# Altium PCB DPM20140124.PcbDoc (part 1 of 3)
Units mil, origin at the board's own origin, x right, y up, seen from the top; angles counter-clockwise.
Board outline 4950 x 7375 mil, 2 copper layers (Top Layer, Bottom Layer); 198 components, 330 nets, 1077 pads, 152 vias.
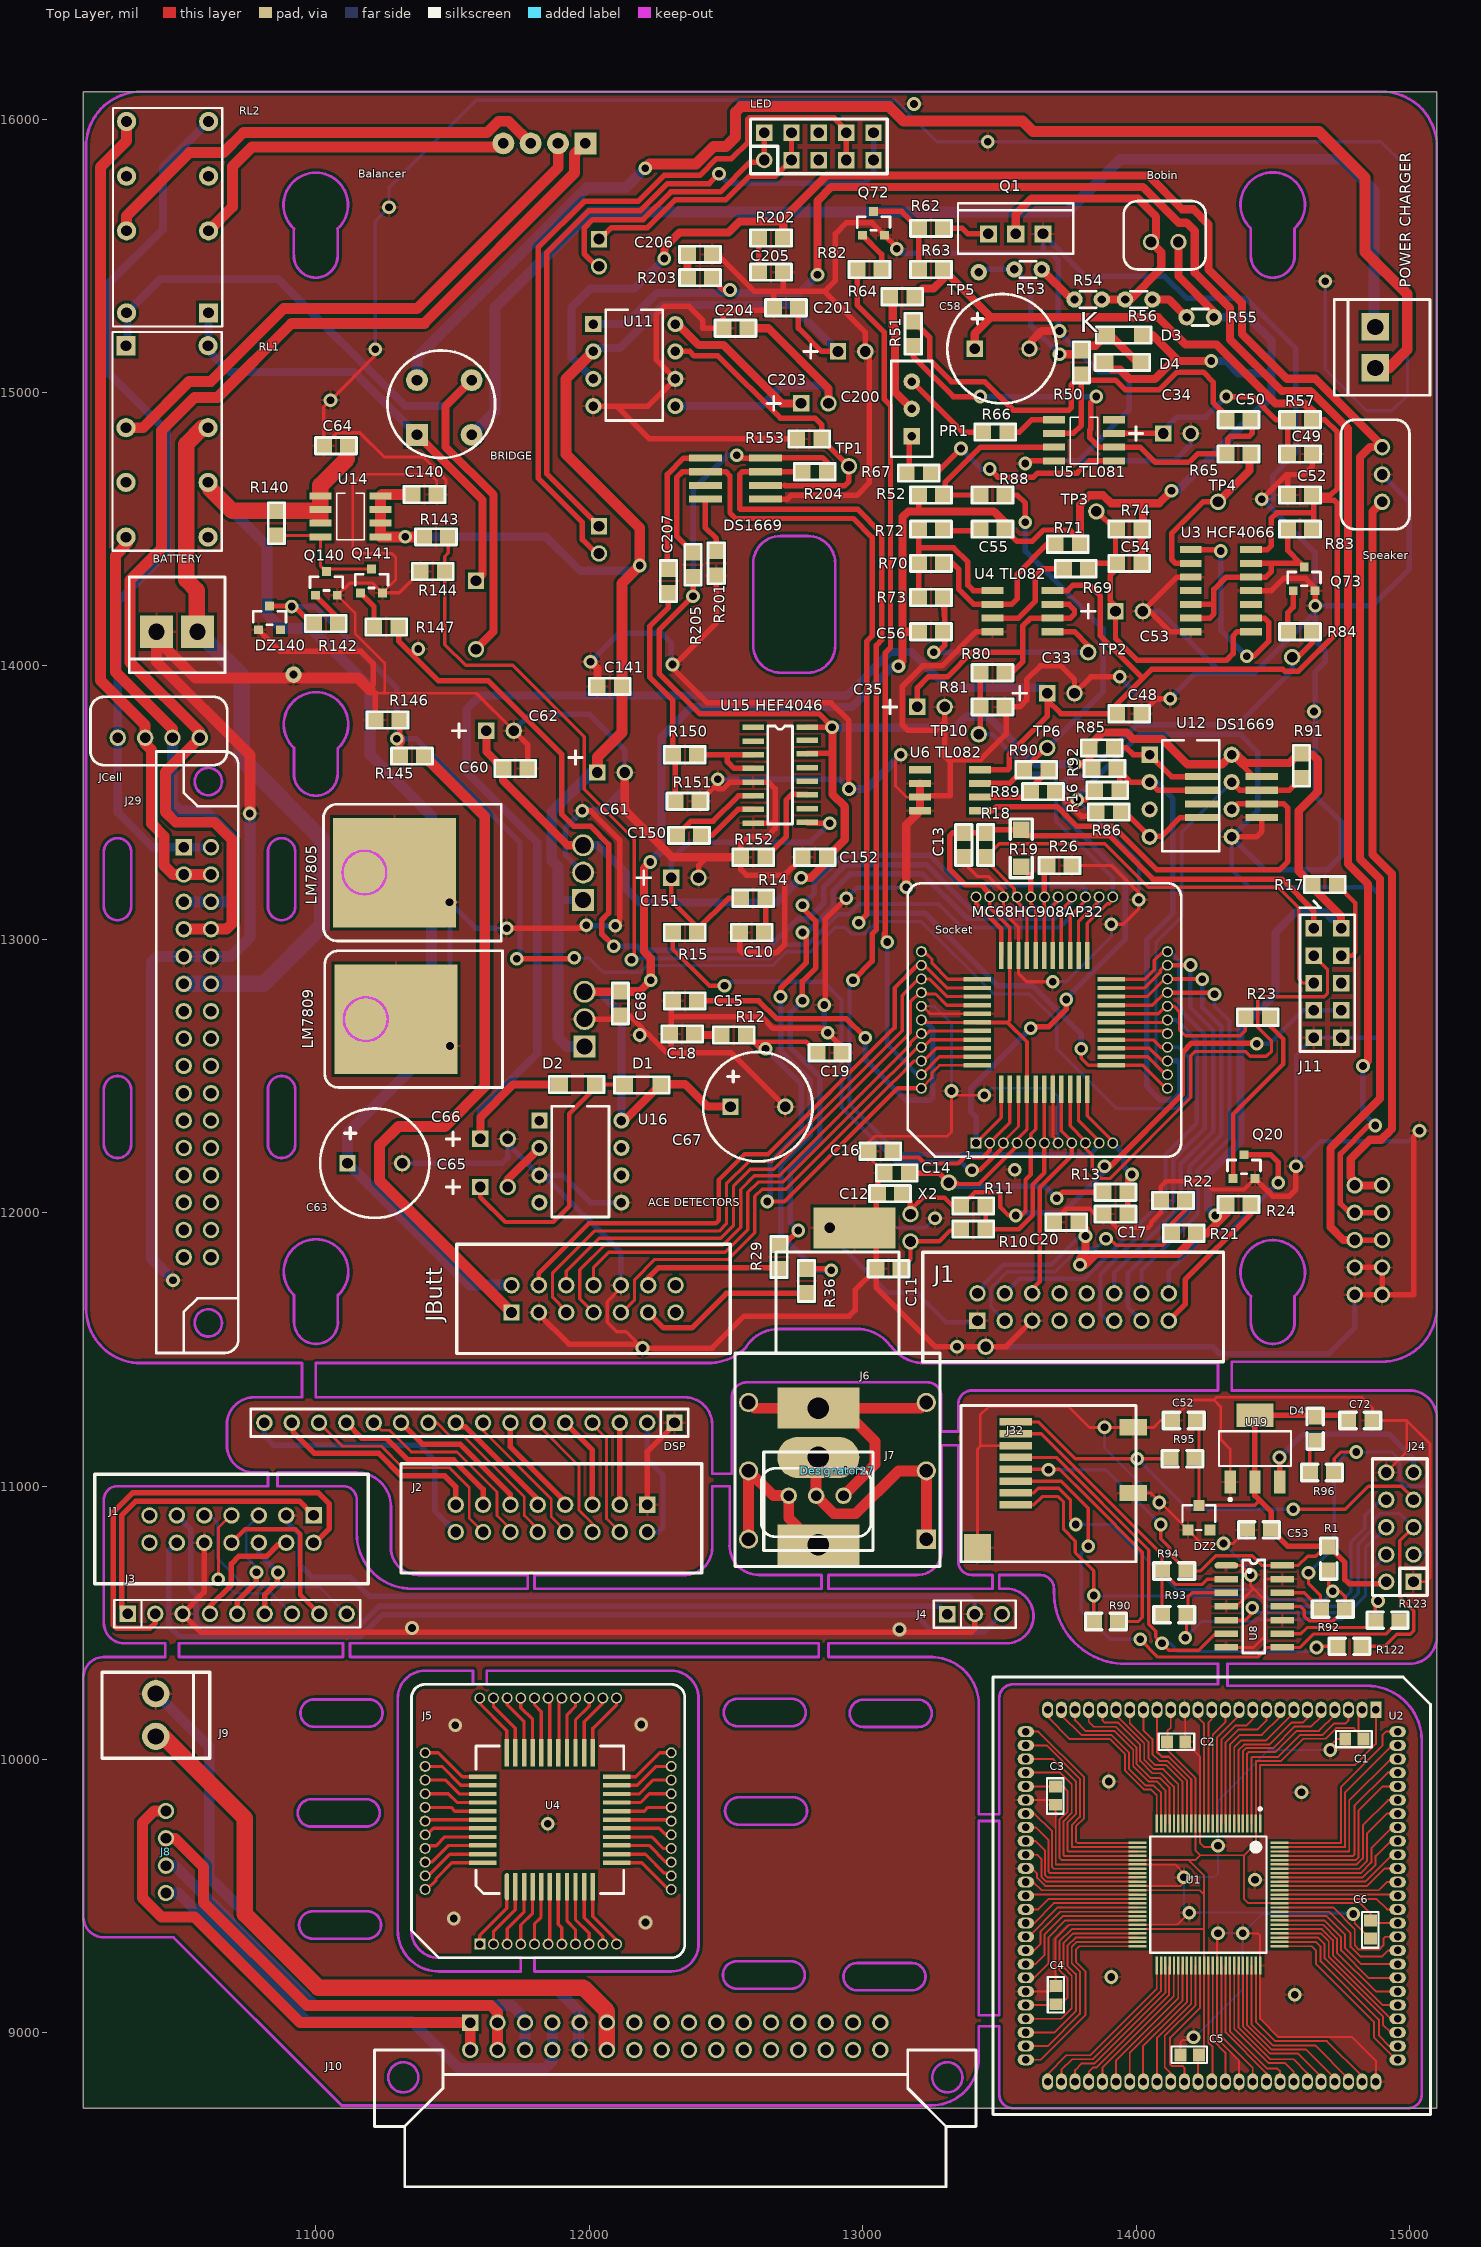
[diagram p0: Top Layer view]
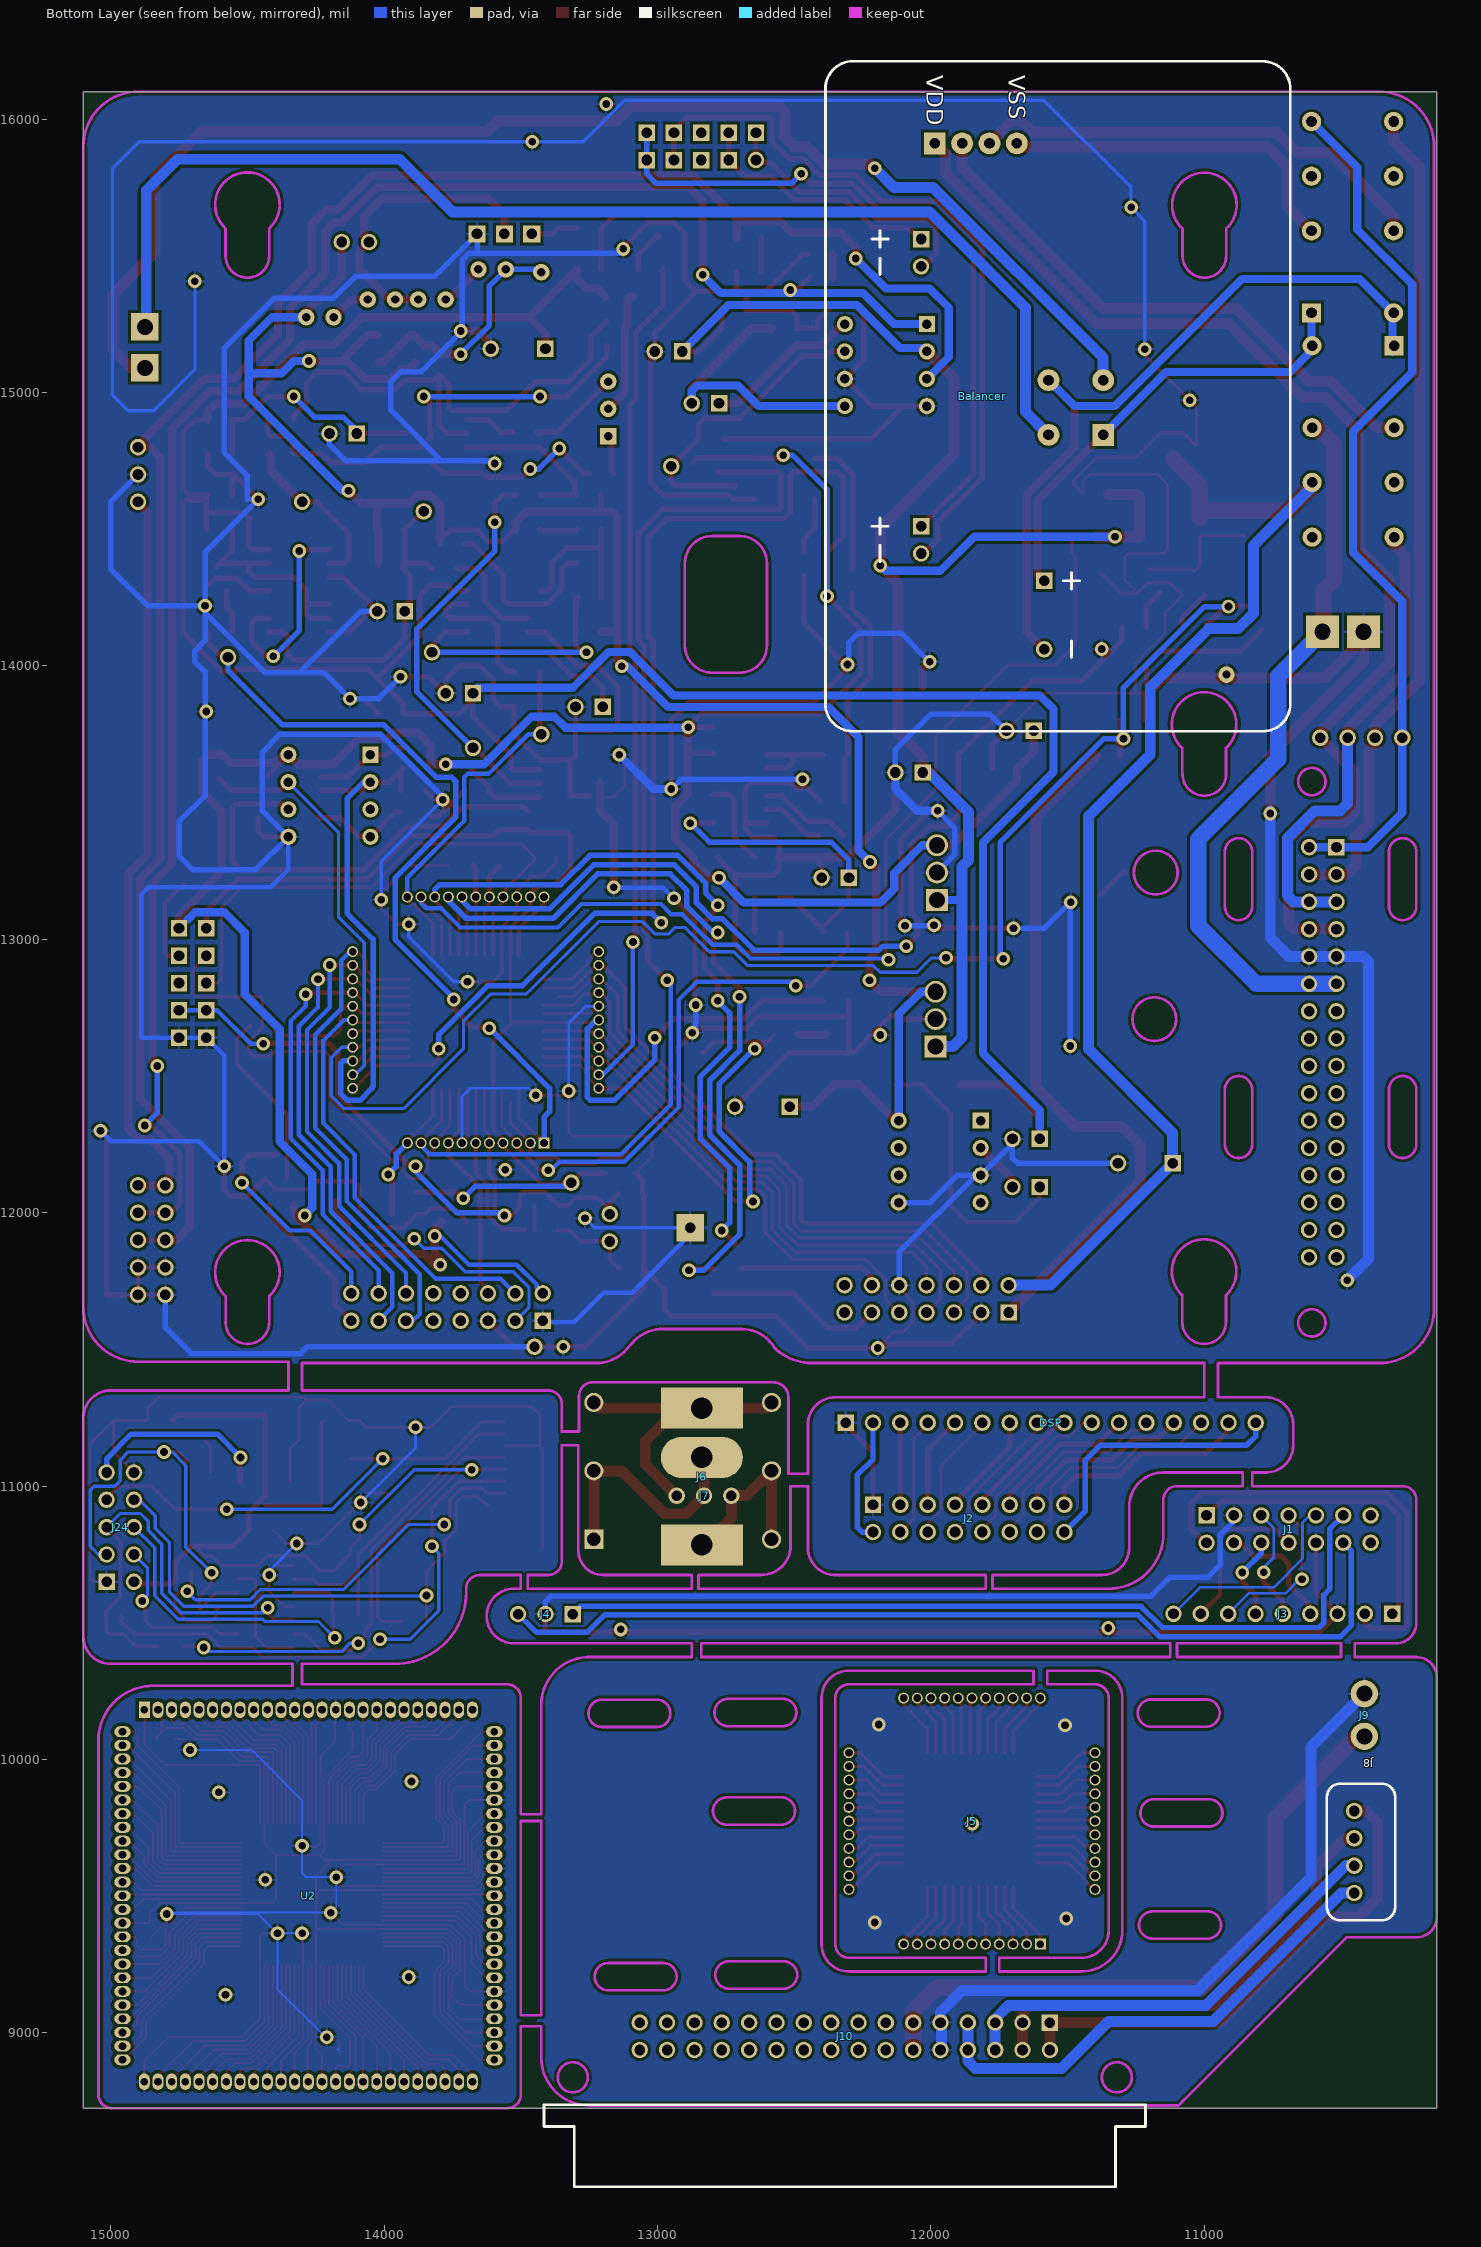
[diagram p1: Bottom Layer view, seen from below]

## Layer stack, top to bottom
Top Layer: signal copper 1.4
Dielectric: dielectric 12.6, FR-4, Dk 4.8
Bottom Layer: signal copper 1.4

## Board outline
10150,16100 10150,8725 15100,8725 15100,16100 10150,16100

## Design rules (kind name [scope] priority, off if disabled: settings)
Clearance [All] p1: gap=10
ComponentClearance [All] p1 off: gap=10 collisioncheckmode=3 verticalgap=10 showdistances=FALSE
FabricationTestPointUsage TestPointUsage [All] p1: valid=0 allowmultiple=FALSE
FabricationTestpoint Testpoint [All] p1: side=3 testpointundercomponent=TRUE minsize=40 maxsize=100 preferedsize=60 minholesize=0 maxholesize=40 preferedholesize=32 testpointgrid=1 allowsidetop=TRUE allowsidebottom=TRUE usegrid=TRUE gridtolerance=0.01
Height [All] p1 off: minheight=0 maxheight=1000 prefheight=500
PolygonConnect [All] p1: connectstyle=Relief reliefconductorwidth=10 reliefentries=4 polygonreliefangle="90 Angle" airgapwidth=10
RoomDefinition BLCR20140120_1 [InComponentClass('BLCR20140120')] p1: confinementstyle=ConfineIn formatcopy=TRUE lockcomponents=FALSE outline 10150,11463 15100,11463 15100,16100 10150,16100
RoutingPriority [All] p1: routingpriority=4
RoutingVias [All] p1: holewidth=28 width=50 viastyle="Through Hole" minholewidth=28 minwidth=50 maxholewidth=28 maxwidth=50
SolderMaskExpansion [All] p1: expansion=4
Width [All] p1: maxlimit=1000 minlimit=5 preferedwidth=8
23 further rules are at their usual default settings.

## Components (designator, comment, footprint, x,y, rotation, side; value= is the part's Value field where it differs from the comment)
Balancer "Comment" "BALANCER 18V" 11486,16411 r270 bottom
BATTERY "" NEWBOR#1 10418,14125 r90 top
Bobin "" SIP2PST7600 14055,15550 r0 top
BRIDGE "" BRIDGE 11310,15105 r0 top
C1 "100n" 0603 14831.93,10075 r180 bottom
C2 "100n" 0603 14113.07,10065 r0 bottom
C3 "100n" 0603 13705,9901.93 r270 bottom
C4 "100n" 0603 13707,9105.07 r90 bottom
C5 "100n" 0603 14230,8920 r180 bottom
C6 "100n" 0603 14857,9412 r270 bottom
C10 "100nF" 0805#1 12595,13025 r0 top
C11 "27pF" 0805#1 13095,11795 r180 top
C12 "27pF" 0805#1 13100,12070 r180 top
C13 "100nF" 0805#1 13370,13345 r90 top
C14 "100nF" 0805#1 13125,12145 r0 top
C15 "100nF" 0805#1 12350,12775 r0 top
C16 "100nF" 0805#1 13065,12225 r0 top
C17 "100nF" 0805#1 13925,11995 r180 top
C18 "470nF" 0805#1 12340,12654 r180 top
C19 "22nF" 0805#1 12879,12585 r0 top
C20 "100nF" 0805#1 13745,11965 r0 top
C33 "10uF/16V" CAP100RP 13675,13900 r0 top
C34 "100uF/25V" CAP100RP 14100,14850 r0 top
C35 "1uF/25V" CAP100RP 13200,13850 r0 top
C48 "100nF" 0805#1 13975,13825 r0 top
C49 "100nF" 0805#1 14600,14775 r0 top
C50 "470pF" 0805#1 14375,14900 r0 top
C52 "100n" 0805#1 14600,14625 r180 top
C52 "100n" 0805#2 14220,11240 r180 bottom
C53 "1uF/16V" CAP100RP 13925,14200 r0 top
C53 "1u" 0805#2 14495,10840 r180 bottom
C54 "100n" 0805#1 13975,14375 r180 top
C55 "100n" 0805#1 13475,14500 r180 top
C56 "100n" 0805#1 13250,14125 r0 top
C58 "Comment" C200+ 13410,15160 r0 top
C60 "100nF" 0805#1 11730,13625 r0 top
C61 "10uF/16V" CAP100RP 12030,13610 r0 top
C62 "10uF/16V" CAP100RP 11624,13763 r0 top
C63 "1000" C200+ 11116,12181 r0 top
C64 "100nF" 0805#1 11074,14805 r180 top
C65 "10uF/16V" CAP100RP 11602,12094 r0 top
C66 "47uF/25V" CAP100RP 11602,12270 r0 top
C67 "1000uF/25V" C200+ 12517,12388 r0 top
C68 "100nF" 0805#1 12114,12765 r270 top
C72 "100n" 0805#2 14775,11240 r0 bottom
C140 "1uF" 0805#1 11398,14627 r180 top
C141 "100nF" 0805#1 12075,13925 r0 top
C150 "10nF" 0805#1 12365,13380 r0 top
C151 "10uF/16V" CAP100RP 12300,13225 r0 top
C152 "100nF" 0805#1 12825,13300 r180 top
C200 "10uF/16V" CAP100RP 12910,15150 r0 top
C201 "100nF" 0805#1 12720,15310 r0 top
C203 "10uF/16V" CAP100RP 12775,14960 r0 top
C204 "100nF" 0805#1 12535,15235 r0 top
C205 "100nF" 0805#1 12665,15440 r180 top
C206 "100nF" 0805#1 12405,15505 r180 top
C207 "470pF" 0805#1 12290,14310 r270 top
D1 "1N4148" 1206K 12263,12467 r180 top
D2 "1N4148" 1206K 12024,12469 r180 top
D3 "1N4148" 1206K 14025,15210 r180 top
D4 "1N4148" 1206K 14020,15110 r180 top
D4 "D" 0805#2 14655,11255 r270 bottom
Designator27 "Comment" "JACK 63" 13233,10806 r90 top
DS1669 "" SO8#1 14240,13595 r0 top
DS1669 "" SO8#1 12425,14760 r0 top
DSP "" SIP16 12312,11232 r180 bottom
DZ2 "BZX84C3V3LT1" SOT23 14230,10930 r0 bottom
DZ140 "4V7" SOT-23(A1A2K) 10791,14132 r0 top
J1 "" IDC16X#1 13420,11605 r0 top
J1 "" IDC14X#1 10992,10893 r180 bottom
J2 "" IDC16X#2 12212,10932 r180 bottom locked
J3 "" SIP9 10313,10533 r0 bottom
J4 "" SIP3 13310,10532 r0 bottom
J5 "TQFP44" S127TQFP44#1 11600,9325 r0 bottom
J6 "" SPK 12838,10785 r90 bottom
J7 "" SIP3PST7600 12930,10965 r180 bottom
J8 "" SIP4PST7600 10452,9812 r270 top
J9 "" HEADER2 10415,10241 r270 bottom
J10 "IDC" DIN41612F 11565,9038 r0 bottom
J11 "" CON10FF 14650,13040 r270 top
J24 "" IDC10#1 15015,10650 r90 bottom
J29 "Comment" DIN41612M 10517,13337 r270 top
J32 "MICROSD" MICROSD 13560,11234.84 r270 bottom
JButt "Comment" IDC14X#2 11716,11635 r0 top
JCell "Comment" SIP4PST7600 10276,13737 r0 top
LED "Comment" IDC10#2 12640,15850 r0 top
LM7805 "" TO220H 11978,13144 r90 top
LM7809 "7809" TO220H 11983,12608 r90 top
MC68HC908AP32 "MC68HC908AP32QFP44" QFP44#1 13507,12451 r90 top
"POWER CHARGER" "" NEWBOR#2 14875,15240 r0 top
PR1 "200K - MULTIVUELTAS" PR3 13180,14840 r90 top
Q1 "" TO220 13460,15580 r0 top
Q20 "" SOT-23(BEC) 14355,12125 r0 top
Q72 "BC846" SOT-23(BEC) 13000,15575 r0 top
Q73 "BC846" SOT-23(BEC) 14575,14275 r0 top
Q140 "BC846" SOT-23(BEC) 10999,14258 r0 top
Q141 "BC846" SOT-23(BEC) 11164,14267 r0 top
R1 "10K" 0805#2 14705,10690 r90 bottom
R10 "330K" 0805#1 13405,11940 r0 top
R11 "10M" 0805#1 13405,12025 r180 top
R12 "2K2" 0805#1 12529,12650 r0 top
R13 "10K" 0805#1 13925,12075 r180 top
R14 "0" 0805#1 12600,13150 r0 top
R15 "47K" 0805#1 12350,13025 r180 top
R16 "100K" 0805#1 13895,13545 r0 top
R17 "10K" 0805#1 14690,13200 r180 top
R18 "10K" 0805#1 13450,13345 r90 top
R19 "10K" 1206 13580,13400 r270 top
R21 "10K" 0805#1 14175,11925 r180 top
R22 "1K" 0805#1 14135,12045 r180 top
R23 "10K" 0805#1 14445,12715 r180 top
R24 "10" 0805#1 14375,12030 r0 top
R26 "10K" 0805#1 13720,13270 r180 top
R29 "1K" 0805#1 12694,11838 r270 top
R36 "1K" 0805#1 12795,11750 r270 top
R50 "100" 0805#1 13800,15110 r270 top
R51 "10M" 0805#1 13185,15215 r270 top
R52 "100" 0805#1 13250,14625 r0 top
R53 "390" RES100 13655,15450 r180 top
R54 "100" RES100 13875,15340 r180 top
R55 "390" RES100 14285,15275 r180 top
R56 "100" RES100 14060,15340 r180 top
R57 "100" 0805#1 14600,14900 r180 top
R62 "56" 0805#1 13250,15600 r180 top
R63 "10K" 0805#1 13250,15450 r180 top
R64 "100K" 0805#1 13145,15350 r180 top
R65 "1K" 0805#1 14375,14775 r0 top
R66 "10K" 0805#1 13485,14855 r0 top
R67 "10K" 0805#1 13205,14705 r0 top
R69 "10K" 0805#1 13780,14355 r180 top
R70 "47K" 0805#1 13250,14375 r180 top
R71 "330" 0805#1 13750,14445 r180 top
R72 "100K" 0805#1 13250,14500 r180 top
R73 "100K" 0805#1 13250,14250 r180 top
R74 "10K" 0805#1 13975,14500 r180 top
R80 "10K" 0805#1 13475,13975 r180 top
R81 "4K7" 0805#1 13475,13850 r0 top
R82 "10K" 0805#1 13025,15450 r180 top
R83 "10K" 0805#1 14600,14500 r0 top
R84 "10K" 0805#1 14600,14125 r0 top
R85 "10K" 0805#1 13875,13700 r0 top
R86 "10K" 0805#1 13900,13465 r180 top
R88 "100K" 0805#1 13475,14625 r180 top
R89 "10K" 0805#1 13660,13540 r180 top
R90 "33K" 0805#1 13635,13620 r180 top
R90 "10K" 0805#2 13845,10505 r0 bottom
R91 "10K" 0805#1 14605,13635 r90 top
R92 "10K" 0805#1 13885,13625 r180 top
R92 "10K" 0805#2 14765,10550 r180 bottom
R93 "10K" 0805#2 14095,10530 r0 bottom
R94 "10K" 0805#2 14095,10690 r0 bottom
R95 "10K" 0805#2 14125,11100 r0 bottom
R96 "10K" 0805#2 14725,11050 r180 bottom
R122 "10K" 0805#2 14736,10414 r0 bottom
R123 "10K" 0805#2 14965,10510 r180 bottom
R140 "100k" 0805#1 10856,14522 r270 top
R142 "10K" 0805#1 11037,14155 r180 top
R143 "10K" 0805#1 11440,14472 r180 top
R144 "1K" 0805#1 11428,14345 r0 top
R145 "4K7" 0805#1 11352,13670 r180 top
R146 "47K" 0805#1 11262,13802 r0 top
R147 "10K" 0805#1 11258,14142 r180 top
R150 "390k" 0805#1 12350,13675 r0 top
R151 "470" 0805#1 12360,13505 r0 top
R152 "150k" 0805#1 12600,13300 r0 top
R153 "4K7" 0805#1 12805,14830 r180 top
R201 "0" 0805#1 12465,14375 r90 top
R202 "10R" 0805#1 12665,15565 r0 top
R203 "10R" 0805#1 12405,15420 r0 top
R204 "10k" 0805#1 12825,14710 r0 top
R205 "10k" 0805#1 12380,14370 r270 top
RL1 "" RELE 10306,15171 r0 top
RL2 "" RELE 10608,15291 r180 top
Socket "" S127TQFP44#2 13415,12255 r0 top
Speaker "Comment" SIP3PST7600 14900,14600 r90 top
TP1 "AUDIO" TP#1 12950,14730 r0 top
TP2 "AMP2" TP#1 13825,14050 r0 top
TP3 "SAMP" TP#1 13855,14565 r0 top
TP4 "AMP1" TP#1 14300,14600 r0 top
TP5 "PULSE" TP#2 13425,15440 r0 top
TP6 "AJUSTE" TP#1 13675,13700 r0 top
TP10 "ADC" TP#1 13425,13750 r0 top
U1 "PIC32" "TQFP12X12-G100/N PT" 14453.82,9766.09 r270 bottom
U2 "PIC24FJ" MA240011 14877,10182 r270 bottom
"U3 HCF4066" "" SO14 14200,14425 r0 top
U4 "TQFP44" QFP44#2 11699,9535 r90 bottom
"U4 TL082" "" SO8#2 13475,14275 r0 top
"U5 TL081" "" SO8#2 13700,14900 r0 top
"U6 TL082" "" SO8#2 13210,13620 r0 top
U8 "74HC125" SOIC14 14330.28,10710 r0 bottom
U11 "" DIP8 12015,15250 r0 top
U12 "" DIP-8 14050,13675 r0 top
U14 "IRF7204" SO8#2 11017,14622 r0 top
"U15 HEF4046" "" NSOIC16 12600,13775 r0 top
U16 "" DIP8 11818,12337 r0 top
U19 "L1117" SOT223 14344.45,11015 r0 bottom
X2 "32768Hz" CRYSTAL100 13175,11895 r90 top
? "Comment" CAP200RP2 12680,11945 r0 top

## Footprints (in the part's own frame and the unit in brackets; to place one, negate y for a bottom-side part, rotate by r counter-clockwise, add the part's x,y. Pads: shape width x height; smd on the part's side, far side on the other; paste and mask are expansions set on the pad)
0603 [mm]
  rect 1.1x1.2 smd far side: 1(0,0) 2(1.7,0)
0805#1 [mil]
  rect 60x56 smd: 1(-45,0) 2(45,0)
  silkscreen extent -75,-30 75,30
0805#2 [mil]
  rect 60x50 smd far side: 1(0,0) 2(90,0)
1206 [mil]
  rect 60x60 smd: 1(0,0) 2(135,0)
  silkscreen extent -40,-40 175,40
1206K [mil]
  rect 64x64 smd: 1(0,0) 2(134,0)
  silkscreen extent -30,-30 170,30
"BALANCER 18V" [mil]
  round 60 hole 39: 1(2350,-100) 3(2000,-550) 5(950,-550)
  rect 60x60 hole 39: 2(2100,-100) 4(1900,-550) 6(850,-550)
  round 80 hole 39: 7(500,-200) 8(500,-300) 9(500,-400)
  rect 80x80 hole 39: 10(500,-500)
  silkscreen extent 200,-900 2650,800
BRIDGE [mil]
  round 80 hole 39: 1(60,-60) 2(260,-60) 3(260,-260)
  rect 80x80 hole 39: 4(60,-260)
  silkscreen extent -48,-345 346,49
C200+ [mil]
  rect 60x60 hole 39: 1(0,0)
  round 60 hole 39: 2(200,0)
  silkscreen extent -100,-200 300,200
CAP100RP [mil]
  rect 60x60 hole 39: 1(0,0)
  round 60 hole 39: 2(100,0)
  silkscreen extent -125,-25 -75,25
CAP200RP2 [mil]
  rect 100x100 hole 39: 3(200,0)
CON10FF [mil]
  rect 60x60 hole 39: 1(0,0) 2(0,100) 3(100,0) 4(100,100) 5(200,0) 6(200,100) 7(300,0) 8(300,100) 9(400,0) 10(400,100)
  silkscreen extent -100,-50 450,150
CRYSTAL100 [mil]
  round 60 hole 39: 1(0,0) 2(100,0)
DIN41612F [mil]
  rect 60x60 hole 39: 1(0,0)
  round 60 hole 39: 2(0,100) 3(100,0) 4(100,100) 5(200,0) 6(200,100) 7(300,0) 8(300,100) 9(400,0) 10(400,100) 11(500,0) 12(500,100) 13(600,0) 14(600,100) 15(700,0) 16(700,100) 17(800,0) 18(800,100) 19(900,0) 20(900,100) 21(1000,0) 22(1000,100) 23(1100,0) 24(1100,100) 25(1200,0) 26(1200,100) 27(1300,0) 28(1300,100) 29(1400,0) 30(1400,100) 31(1500,0) 32(1500,100)
  Keep-Out Layer circle w10: c1745,200 r55
  Keep-Out Layer circle w10: c-245,200 r55
  silkscreen extent -350,300 1850,600
DIN41612M [mil]
  rect 60x60 hole 39: 1(0,0)
  round 60 hole 39: 2(0,100) 3(100,0) 4(100,100) 5(200,0) 6(200,100) 7(300,0) 8(300,100) 9(400,0) 10(400,100) 11(500,0) 12(500,100) 13(600,0) 14(600,100) 15(700,0) 16(700,100) 17(800,0) 18(800,100) 19(900,0) 20(900,100) 21(1000,0) 22(1000,100) 23(1100,0) 24(1100,100) 25(1200,0) 26(1200,100) 27(1300,0) 28(1300,100) 29(1400,0) 30(1400,100) 31(1500,0) 32(1500,100)
  Keep-Out Layer circle w10: c1740,90 r50
  Keep-Out Layer circle w10: c-240,90 r50
  silkscreen extent -350,-100 1850,200
DIP8 [mm]
  rect 1.5x1.5 hole 0.889: 1(0,0)
  round 1.5 hole 0.889: 2(0,-2.54) 3(0,-5.08) 4(0,-7.62) 5(7.62,-7.62) 6(7.62,-5.08) 7(7.62,-2.54) 8(7.62,0)
  silkscreen extent 1.16,-8.96 6.46,1.34
DIP-8 [mm]
  rect 1.5x1.5 hole 0.889: 1(0,0)
  round 1.5 hole 0.889: 2(0,-2.54) 3(0,-5.08) 4(0,-7.62) 5(7.62,-7.62) 6(7.62,-5.08) 7(7.62,-2.54) 8(7.62,0)
  silkscreen extent 1.16,-8.96 6.46,1.34
HEADER2 [mil]
  round 100 hole 59: 1(0,0) 2(156,0)
IDC10#1 [mil]
  rect 60x60 hole 39: 1(0,0)
  round 60 hole 39: 2(0,-100) 3(100,0) 4(100,-100) 5(200,0) 6(200,-100) 7(300,0) 8(300,-100) 9(400,0) 10(400,-100)
IDC10#2 [mil]
  round 60 hole 39: 1(0,0)
  rect 60x60 hole 39: 2(0,100) 3(100,0) 4(100,100) 5(200,0) 6(200,100) 7(300,0) 8(300,100) 9(400,0) 10(400,100)
  silkscreen extent -50,-50 450,150
IDC14X#1 [mil]
  rect 60x60 hole 39: 1(0,0)
  round 60 hole 39: 2(0,-100) 3(100,0) 4(100,-100) 5(200,0) 6(200,-100) 7(300,0) 8(300,-100) 9(400,0) 10(400,-100) 11(500,0) 12(500,-100) 13(600,0) 14(600,-100)
IDC14X#2 [mil]
  rect 60x60 hole 39: 1(0,0)
  round 60 hole 39: 2(0,100) 3(100,0) 4(100,100) 5(200,0) 6(200,100) 7(300,0) 8(300,100) 9(400,0) 10(400,100) 11(500,0) 12(500,100) 13(600,0) 14(600,100)
  silkscreen extent -200,-150 800,250
IDC16X#1 [mil]
  rect 60x60 hole 39: 1(0,0)
  round 60 hole 39: 2(0,100) 3(100,0) 4(100,100) 5(200,0) 6(200,100) 7(300,0) 8(300,100) 9(400,0) 10(400,100) 11(500,0) 12(500,100) 13(600,0) 14(600,100) 15(700,0) 16(700,100)
  silkscreen extent -200,-150 900,250
IDC16X#2 [mil]
  rect 60x60 hole 39: 1(0,0)
  round 60 hole 39: 2(0,-100) 3(100,0) 4(100,-100) 5(200,0) 6(200,-100) 7(300,0) 8(300,-100) 9(400,0) 10(400,-100) 11(500,0) 12(500,-100) 13(600,0) 14(600,-100) 15(700,0) 16(700,-100)
"JACK 63" [mil]
  rect 70x70 hole 50: 1(0,0)
  round 70 hole 50: 2(0,650) 3(250,0) 4(250,650) 5(500,0) 6(500,650)
  silkscreen extent -100,-50 1050,700
MA240011 [mil]
  rect 60x40 hole 28: 1(0,0)
  oval 60x40 hole 28: 2(0,50) 3(0,100) 4(0,150) 5(0,200) 6(0,250) 7(0,300) 8(0,350) 9(0,400) 10(0,450) 11(0,500) 12(0,550) 13(0,600) 14(0,650) 15(0,700) 16(0,750) 17(0,800) 18(0,850) 19(0,900) 20(0,950) 21(0,1000) 22(0,1050) 23(0,1100) 24(0,1150) 25(0,1200) 51(1360,1200) 52(1360,1150) 53(1360,1100) 54(1360,1050) 55(1360,1000) 56(1360,950) 57(1360,900) 58(1360,850) 59(1360,800) 60(1360,750) 61(1360,700) 62(1360,650) 63(1360,600) 64(1360,550) 65(1360,500) 66(1360,450) 67(1360,400) 68(1360,350) 69(1360,300) 70(1360,250) 71(1360,200) 72(1360,150) 73(1360,100) 74(1360,50) 75(1360,0)
  oval 40x60 hole 28: 26(80,1280) 27(130,1280) 28(180,1280) 29(230,1280) 30(280,1280) 31(330,1280) 32(380,1280) 33(430,1280) 34(480,1280) 35(530,1280) 36(580,1280) 37(630,1280) 38(680,1280) 39(730,1280) 40(780,1280) 41(830,1280) 42(880,1280) 43(930,1280) 44(980,1280) 45(1030,1280) 46(1080,1280) 47(1130,1280) 48(1180,1280) 49(1230,1280) 50(1280,1280) 76(1280,-80) 77(1230,-80) 78(1180,-80) 79(1130,-80) 80(1080,-80) 81(1030,-80) 82(980,-80) 83(930,-80) 84(880,-80) 85(830,-80) 86(780,-80) 87(730,-80) 88(680,-80) 89(630,-80) 90(580,-80) 91(530,-80) 92(480,-80) 93(430,-80) 94(380,-80) 95(330,-80) 96(280,-80) 97(230,-80) 98(180,-80) 99(130,-80) 100(80,-80)
MICROSD [mm]
  rect 0.7x3 smd far side: 1(7.7,0) 2(6.6,0) 3(5.5,0) 4(4.4,0) 5(3.3,0) 6(2.2,0) 7(1.1,0) 8(0,0)
  rect 1.524x2.54 smd far side: 9(0.508,-10.922) 9(6.604,-10.922)
  rect 2.54x2.54 smd far side: 9(11.684,3.556)
NEWBOR#1 [mil]
  rect 120x120 hole 59: 1(0,0) 2(0,-150)
  silkscreen extent -150,-250 200,100
NEWBOR#2 [mil]
  rect 100x100 hole 59: 1(0,0) 2(0,-150)
  silkscreen extent -150,-250 200,100
NSOIC16 [mm]
  rect 2x0.5 smd: 1(0,-0.001) 2(0,-1.271) 3(0,-2.541) 4(0,-3.811) 5(0,-5.081) 6(0,-6.351) 7(0,-7.621) 8(0,-8.891) 9(5,-8.811) 10(5,-7.541) 11(5,-6.271) 12(5,-5.001) 13(5,-3.731) 14(5,-2.461) 15(5,-1.191) 16(5,-0.001)
  silkscreen extent 1.34,-8.98 3.64,0.12
PR3 [mil]
  rect 60x60 hole 31: 1(0,0)
  round 60 hole 31: 2(100,0) 3(200,0)
  silkscreen extent -75,-75 275,75
QFP44#1 [mil]
  rect 100x16 smd: 1(0,0) 2(0,-31) 3(0,-63) 4(0,-94) 5(0,-126) 6(0,-157) 7(0,-189) 8(0,-220) 9(0,-252) 10(0,-283) 11(0,-315) 23(490,-315) 24(490,-283) 25(490,-252) 26(490,-220) 27(490,-189) 28(490,-157) 29(490,-126) 30(490,-94) 31(490,-63) 32(490,-31) 33(490,0)
  rect 16x100 smd: 12(88,-403) 13(119,-403) 14(151,-403) 15(181,-403) 16(214,-403) 17(245,-403) 18(277,-403) 19(308,-403) 20(340,-403) 21(371,-403) 22(403,-403) 34(403,88) 35(371,88) 36(340,88) 37(308,88) 38(277,88) 39(245,88) 40(214,88) 41(182,88) 42(151,88) 43(119,88) 44(88,88)
QFP44#2 [mil]
  oval 100x16 smd far side: 1(0,0)
  rect 100x16 smd far side: 2(0,31) 3(0,63) 4(0,94) 5(0,126) 6(0,157) 7(0,188) 8(0,220) 9(0,251) 10(0,283) 11(0,314) 23(490,314) 24(490,283) 25(490,251) 26(490,220) 27(490,188) 28(490,157) 29(490,126) 30(490,94) 31(490,63) 32(490,31) 33(490,0)
  rect 16x100 smd far side: 12(88,402) 13(119,402) 14(151,402) 15(182,402) 16(214,402) 17(245,402) 18(276,402) 19(308,402) 20(339,402) 21(371,402) 22(402,402) 34(402,-88) 35(371,-88) 36(339,-88) 37(308,-88) 38(276,-88) 39(245,-88) 40(214,-88) 41(182,-88) 42(151,-88) 43(119,-88) 44(88,-88)
RELE [mil]
  rect 70x70 hole 39: 1(0,0)
  round 70 hole 39: 2(0,-300) 3(0,-500) 4(0,-700) 5(300,-700) 6(300,-500) 7(300,-300) 8(300,0)
  silkscreen extent -50,-750 350,50
RES100 [mil]
  round 60 hole 31: 1(0,0) 2(100,0)
  silkscreen extent 20,-30 80,30
S127TQFP44#1 [mil]
  rect 40x40 hole 28: 1(0,0)
  round 40 hole 28: 2(50,0) 3(100,0) 4(150,0) 5(200,0) 6(250,0) 7(300,0) 8(350,0) 9(400,0) 10(450,0) 11(500,0) 12(700,-200) 13(700,-250) 14(700,-300) 15(700,-350) 16(700,-400) 17(700,-450) 18(700,-500) 19(700,-550) 20(700,-600) 21(700,-650) 22(700,-700) 23(500,-900) 24(450,-900) 25(400,-900) 26(350,-900) 27(300,-900) 28(250,-900) 29(200,-900) 30(150,-900) 31(100,-900) 32(50,-900) 33(0,-900) 34(-200,-700) 35(-200,-650) 36(-200,-600) 37(-200,-550) 38(-200,-500) 39(-200,-450) 40(-200,-400) 41(-200,-350) 42(-200,-300) 43(-200,-250) 44(-200,-200)
S127TQFP44#2 [mil]
  rect 40x40 hole 28: 1(0,0)
  round 40 hole 28: 2(50,0) 3(100,0) 4(150,0) 5(200,0) 6(250,0) 7(300,0) 8(350,0) 9(400,0) 10(450,0) 11(500,0) 12(700,200) 13(700,250) 14(700,300) 15(700,350) 16(700,400) 17(700,450) 18(700,500) 19(700,550) 20(700,600) 21(700,650) 22(700,700) 23(500,900) 24(450,900) 25(400,900) 26(350,900) 27(300,900) 28(250,900) 29(200,900) 30(150,900) 31(100,900) 32(50,900) 33(0,900) 34(-200,700) 35(-200,650) 36(-200,600) 37(-200,550) 38(-200,500) 39(-200,450) 40(-200,400) 41(-200,350) 42(-200,300) 43(-200,250) 44(-200,200)
  silkscreen extent -250,-50 750,950
SIP2PST7600 [mil]
  round 60 hole 39: 1(0,0) 2(100,0)
  silkscreen extent -100,-100 200,150
SIP3 [mil]
  rect 60x60 hole 39: 1(0,0)
  round 60 hole 39: 2(100,0) 3(200,0)
SIP3PST7600 [mil]
  round 60 hole 39: 1(0,0) 2(100,0) 3(200,0)
SIP4PST7600 [mil]
  round 60 hole 39: 1(0,0) 2(100,0) 3(200,0) 4(300,0)
SIP9 [mil]
  rect 60x60 hole 39: 1(0,0)
  round 60 hole 39: 2(100,0) 3(200,0) 4(300,0) 5(400,0) 6(500,0) 7(600,0) 8(700,0) 9(800,0)
SIP16 [mil]
  rect 60x60 hole 39: 1(0,0)
  round 60 hole 39: 2(100,0) 3(200,0) 4(300,0) 5(400,0) 6(500,0) 7(600,0) 8(700,0) 9(800,0) 10(900,0) 11(1000,0) 12(1100,0) 13(1200,0) 14(1300,0) 15(1400,0) 16(1500,0)
SO8#1 [mil]
  rect 120x26 smd: 1(0,0) 2(0,-50) 3(0,-100) 4(0,-150) 5(220,-150) 6(220,-100) 7(220,-50) 8(220,0)
SO8#2 [mil]
  rect 80x26 smd: 1(0,0) 2(0,-50) 3(0,-100) 4(0,-150) 5(220,-150) 6(220,-100) 7(220,-50) 8(220,0)
SO14 [mil]
  rect 80x26 smd: 1(0,0) 2(0,-50) 3(0,-100) 4(0,-150) 5(0,-200) 6(0,-250) 7(0,-300) 8(220,-300) 9(220,-250) 10(220,-200) 11(220,-150) 12(220,-100) 13(220,-50) 14(220,0)
SOIC14 [mm]
  oval 2.2x0.6 smd far side: 1(0,0)
  rect 2.2x0.6 smd far side: 2(0,1.27) 3(0,2.54) 4(0,3.81) 5(0,5.08) 6(0,6.35) 7(0,7.62) 8(5.2,7.62) 9(5.2,6.35) 10(5.2,5.08) 11(5.2,3.81) 12(5.2,2.54) 13(5.2,1.27) 14(5.2,0)
SOT23 [mil]
  rect 40x40 smd far side: 1(-40,90) 2(40,90) 3(0,0)
SOT223 [mm]
  rect 1.05x2.15 smd far side: 1(0,0) 2(2.3,0) 3(4.6,0)
  rect 3.4x2.15 smd far side: 2(2.3,-6.2)
SOT-23(A1A2K) [mil]
  rect 32x32 smd: 1(0,0) 2(80,0) 3(40,87)
  silkscreen extent -20,18 100,68
SOT-23(BEC) [mil]
  rect 32x32 smd: 1(0,0) 2(40,87) 3(80,0)
  silkscreen extent -20,18 100,68
SPK [mil]
  rect 150x300 hole 79: 1(0,0) 3(500,0)
  oval 150x300 hole 79: 2(320,0)
TO220 [mm]
  rect 1.6x1.6 hole 0.991: 1(0,0) 2(2.54,0) 3(5.08,0)
  silkscreen extent -2.81,-1.85 7.89,2.85
TO220H [mil]
  rect 80x80 hole 59: 1(0,0)
  rect 400x450 smd: 2(100,690)
  round 80 hole 59: 2(100,0) 3(200,0)
  Keep-Out Layer circle w10: c100,800 r80
  silkscreen extent -150,300 350,950
TP#1 [mil]
  round 60 hole 39: 1(0,0)
TP#2 [mil]
  round 60 hole 31: 1(0,0)
"TQFP12X12-G100/N PT" [mil]
  rect 65x9 smd far side: 1(0,0) 2(0,15.75) 3(0,31.5) 4(0,47.24) 5(0,62.99) 6(0,78.74) 7(0,94.49) 8(0,110.24) 9(0,125.98) 10(0,141.73) 11(0,157.48) 12(0,173.23) 13(0,188.98) 14(0,204.72) 15(0,220.47) 16(0,236.22) 17(0,251.97) 18(0,267.72) 19(0,283.46) 20(0,299.21) 21(0,314.96) 22(0,330.71) 23(0,346.46) 24(0,362.2) 25(0,377.95) 51(519.68,377.95) 52(519.68,362.2) 53(519.68,346.46) 54(519.68,330.71) 55(519.68,314.96) 56(519.68,299.21) 57(519.68,283.46) 58(519.68,267.72) 59(519.68,251.97) 60(519.68,236.22) 61(519.68,220.47) 62(519.68,204.72) 63(519.68,188.98) 64(519.68,173.23) 65(519.68,157.48) 66(519.68,141.73) 67(519.68,125.98) 68(519.68,110.24) 69(519.68,94.49) 70(519.68,78.74) 71(519.68,62.99) 72(519.68,47.24) 73(519.68,31.5) 74(519.68,15.75) 75(519.68,0)
  rect 9x65 smd far side: 26(70.87,448.82) 27(86.61,448.82) 28(102.36,448.82) 29(118.11,448.82) 30(133.86,448.82) 31(149.61,448.82) 32(165.35,448.82) 33(181.1,448.82) 34(196.85,448.82) 35(212.6,448.82) 36(228.35,448.82) 37(244.09,448.82) 38(259.84,448.82) 39(275.59,448.82) 40(291.34,448.82) 41(307.09,448.82) 42(322.83,448.82) 43(338.58,448.82) 44(354.33,448.82) 45(370.08,448.82) 46(385.83,448.82) 47(401.57,448.82) 48(417.32,448.82) 49(433.07,448.82) 50(448.82,448.82) 76(448.82,-70.87) 77(433.07,-70.87) 78(417.32,-70.87) 79(401.57,-70.87) 80(385.83,-70.87) 81(370.08,-70.87) 82(354.33,-70.87) 83(338.58,-70.87) 84(322.83,-70.87) 85(307.09,-70.87) 86(291.34,-70.87) 87(275.59,-70.87) 88(259.84,-70.87) 89(244.09,-70.87) 90(228.35,-70.87) 91(212.6,-70.87) 92(196.85,-70.87) 93(181.1,-70.87) 94(165.35,-70.87) 95(149.61,-70.87) 96(133.86,-70.87) 97(118.11,-70.87) 98(102.36,-70.87) 99(86.61,-70.87) 100(70.87,-70.87)

## Part data
C1 C2 C3 C4 C5 C6 C52 C53 C72: library part C, "Capacitor"
D4: "Diode Led"
DSP: library part DISPLAY, "Conector"
DZ2: "Zener Voltage Regulator Diode"
J1: library part IDC14, "Connector"
J2: library part IDC16, "CNX"
J3: library part SIP9, "Conector"
J4 J6 J7: library part SIP3, "Conector"
J5 U2 U4: "Microcontroller"
J8: library part SIP4, "Conector"
J9: library part SIP2, "Conector"
J10: library part IDC32, "Connector"
J24: library part SIP10, "Conector"
J32: "SD"
R1 R90 R92 R93 R94 R95 R96 R122 R123: library part R, "R"
U1: library part PIC24FJ, "Microcontroller"
U8: "U"
U19: "Regulator"

## Free pads (board coordinates)
  round 60 hole 30: 0(10919,13968)
  round 60 hole 39: 0(14571,14032) 2(14900,11800) 3(14900,11700) 4(14800,11800) 5(14800,11700) 5(14900,11900) 20(14800,11900) 21(14800,12000) 22(14900,12100) 23(14900,12000) 24(14800,12100)
  round 50 hole 28: 1(10912,14217) 16(13090,12990) 17(12986,13061)
  rect 300x150 smd: 4(12970,11945)
  round 60 hole 38: 30(13315,12110) 34(13450,11510)

## Via types
v1: diameter 50, hole 28, Top Layer to Bottom Layer, 152 vias

## Nets (pads, with @x,y where several pads share a name; then routed paths per layer and width w, separated by ;. In a path a pad name is that pad's centre, name@x,y a point inside that pad or via, vN(x,y) a via of type N, cw(c..) or ccw(c..) an arc to the next point about the centre after c; other vN are vias at no path point)
5VCC: C13.2 C14.2 C15.2 J11.1 MC68HC908AP32.4 MC68HC908AP32.32 MC68HC908AP32.39 pad.30 R13.2 R18.2 R19.1 Socket.4 Socket.32 Socket.39 | length 5559.4
  Top Layer w12: Socket.39@13215,12705 13224,12696 MC68HC908AP32.39@13419,12696 ; 13530.36,12696 13538,12703.64 MC68HC908AP32.32@13538,12941 ; Socket.4@13565,12268 13601,12304 MC68HC908AP32.4@13601,12451
  Top Layer w14: MC68HC908AP32.39@13419,12696 13530.36,12696 13601,12625.36 MC68HC908AP32.4@13601,12451 ; Socket.32@13465,13155 13465,13116.36 13538,13043.36 MC68HC908AP32.32@13538,12941
  Top Layer w16: pad.30@13315,12110 13344,12110 13349,12105 13426,12105 13565,12244 Socket.4@13565,12255 Socket.4@13565,12268
  Top Layer w20: C15.2@12395,12775 12620.08,12775 12685.08,12710 12940,12710 v1(13010,12640) ; C14.2@13195,12145 13280,12145 pad.30@13315,12110 ; Socket.32@13465,13155 13459,13161 13459,13173.23 13432.23,13200 13375.23,13200 13318,13257.23 13318,13378 13330,13390 C13.2@13370,13390 R18.2@13450,13390 13465,13390 13475,13400 R19.1@13580,13400 13601,13379 13902.92,13379 14061.92,13220 14535,13220 14535,13218.06 14650,13103.06 J11.1@14650,13040 ; v1(13710,12053) 13732,12075 R13.2@13880,12075
  Bottom Layer w20: v1(13010,12640) 13010,12560 13159,12411 13246,12411 13257,12422 13257,12672.4 13224.4,12705 Socket.39@13215,12705 ; pad.30@13315,12096 13667,12096 v1(13710,12053)
9V: Bobin.2 C54.1 C55.1 C56.1 C67.1 C68.1 D1.1 D3.1 D4.2@13886,15110 LM7809.3 R52.1 R55.1 R71.1 R74.1 U16.8 | length 7601.2
  Top Layer w20: 13205,14565 R52.1@13205,14625 ; C55.1@13520,14500 13565,14455 13620,14455 13662,14497 13758,14497 13795,14460 R71.1@13795,14445 ; R74.1@14020,14500 R74.1@14025,14500
  Top Layer w30: LM7809.3@11983,12808 12183,12808 12185,12810 ; C68.1@12114,12810 12185,12810 ; U16.8@12118,12337 12130,12337 12263,12470 12351,12470 12433,12388 C67.1@12517,12388 ; v1(12223,13283) 12200,13260 12200,12963 12201,12962 12201,12955.37 12225,12931.37 v1(12225,12850) 12185,12810 ; v1(13131,13999) 13130,14000 13146,14016 13146,14125 ; C56.1@13205,14125 13146,14125 ; C55.1@13520,14500 13520,14525 13480,14565 13205,14565 13166.99,14565 13146,14544.01 13146,14125 ; R71.1@13795,14460 13795,14589 13830,14624 13879.44,14624 13908.44,14595 14025,14595 ; D4.2@13886,15110 13912,15084 13940.99,15084 13975.99,15049 14068.85,15049 14134.85,15115 14155,15115 ; C54.1@14020,14375 R74.1@14020,14500 ; R74.1@14025,14500 14025,14595 ; D3.1@14025,15210 14060,15210 14155,15115 ; v1(14130,14640) 14085,14595 14025,14595 ; Bobin.2@14155,15550 14155,15425 14285,15295 R55.1@14285,15275 ; v1(14275,15115) 14155,15115
  Bottom Layer w30: LM7809.3@11983,12808 12037,12808 12118,12727 U16.8@12118,12337 ; v1@12215,13275 v1(12223,13283) 12265,13325 12265,13740 12375,13850 12961,13850 13111,14000 13130,14000 v1(13131,13999) ; v1(14130,14640) 14150,14640 14495,14985 14495,15080 ; v1(14275,15115) 14330,15115 14375,15070 14485,15070 14495,15080 ; R55.1@14285,15275 14410,15275 14495,15190 14495,15080
16V: "U3 HCF4066.14" "U4 TL082.8" "U6 TL082.8" C33.1 C48.1 C52.1@14645,14625 C58.1 C66.1 D2.2 R57.1 R63.1 R64.1 R83.2 | length 10025.6
  Top Layer w20: 13430,13620 13531,13620 13536,13625 13536,13676 13675,13815 C33.1@13675,13875 ; C33.1@13675,13900 C33.1@13675,13875 ; 13695,14275 13750,14275 13770,14295 13830,14295 13870,14255 13870,14109.75 14022.25,13957.5 14027.5,13957.5 ; C48.1@13930,13825 C48.1@13925,13825 ; 14420,14425 14480,14425 14495,14440 14495,14540 14515,14560 14650,14560 ; R83.2@14645,14500 14650,14505 14650,14560 ; C52.1@14645,14625 C52.1@14650,14625 ; R57.1@14645,14900 14691,14900 14736,14855 14736,14649 14712,14625 C52.1@14650,14625 ; C33.1@13675,13875 13725,13825 C48.1@13925,13825 ; C48.1@13925,13825 13930,13830 13930,13860 14027.5,13957.5 ; 14027.5,13957.5 14058,13988 14536,13988 14544,13980 14593,13980 14736,14123 14736,14594 14725,14605 14670,14605 C52.1@14650,14625 ; 14650,14560 C52.1@14650,14625
  Top Layer w30: C66.1@11602,12270 11602,12349 11722,12469 D2.2@11890,12469 ; R64.1@13190,15350 13220,15380 13260,15380 13295,15415 R63.1@13295,15450 13470,15275 ; C58.1@13410,15160 13410,15215 13470,15275 ; R57.1@14645,14909.01 R57.1@14645,14900 14646,14901 14646,14931 14617,14960 14510,14960 14295,15175 14181,15175 14081,15275 13470,15275
  Bottom Layer w30: 11602,12313 11602,12375 11810,12583 11810,13354.15 11552,13612.15 11552,13842 11602,13892 12942,13892 13101,14051 13179,14051 13310,13920 13660,13920 13675,13905 C33.1@13675,13900
+3V3: C1.1 C2.1 C3.1 C4.1 C5.1 C6.1 U1.2 U1.16 U1.30 U1.37 U1.46 U1.62 U1.86 U2.2 U2.16 U2.30 U2.37 U2.46 U2.62 U2.86 | length 5825
  Top Layer w7: U2.46@13597,9102 13703.93,9102 C4.1@13707,9105.07 13725.07,9105.07 13750,9130 13750,9200 13720,9230 13720,9335 13765.27,9380.27 U1.46@14005,9380.27 14244.73,9380.27 14249.09,9375.91 ; U2.37@13597,9552 13625,9552 13655,9522 U1.37@14005,9522 14233,9522 14249.09,9505.91 ; U2.30@13597,9902 13704.93,9902 C3.1@13705,9901.93 13733.07,9901.93 13750,9885 13750,9810 13720,9780 13720,9640 13727.76,9632.24 U1.30@14005,9632.24 14192.76,9632.24 ; U2.16@14127,10182 14127,10117 14115,10105 14115,10035 14217.6,9932.4 U1.16@14217.6,9766.09 14217.6,9667.4 14235,9650 ; U2.62@14227,8822 14227,8918.93 14249.09,8941.02 U1.62@14249.09,9246.41 14249.09,9375.91 ; U2.2@14827,10182 14813.93,10168.93 C1.1@14813.93,10098.07 ; C1.1@14831.93,10075 14831.93,10080.07 C1.1@14813.93,10098.07 ; C6.1@14854.88,9409.88 14862.76,9402 U2.86@14957,9402 ; C6.1@14857,9412 14857,9438 14820.24,9474.76 U1.86@14524.68,9474.76 14410.24,9474.76 14395,9490 14395,9650 ; 14192.76,9632.24 14217.24,9632.24 14235,9650 ; 14192.76,9632.24 14249.09,9575.91 14249.09,9505.91 ; 14235,9650 14395,9650 ; 14249.09,9375.91 14249.09,9505.91 ; 14395,9650 14438.07,9693.07 U1.2@14438.07,9766.09 14438.07,9994.07 14439,9995 14531,9995 14612,10076 14693,10076 14732,10115 14797,10115 C1.1@14813.93,10098.07
+5: 
+5V: "U15 HEF4046.14" "U15 HEF4046.16" C20.2 C60.1 C62.1 C152.1 DS1669.8 J1.2@13420,11705 J11.2 LM7805.3 R17.2 R21.1 R24.1 R85.1 R91.2 R92.2@13840,13625 R204.2 R205.2 U12.8 | length 10058.6
  Top Layer w20: R205.2@12380,14325 v1(12380,14255) 12256,14131 12256,13973 12404,13825 12840,13825 v1@12889,13776 ; v1(12540,14770) 12550,14760 DS1669.8@12645,14760 12647,14762 12853,14762 12870,14745 ; 12796.85,13678.11 12798.74,13680 12890,13680 ; 12796.85,13774.96 12796.89,13775 v1(12888,13775) ; U12.8@14350,13675 14430,13595 DS1669.8@14450,13595
  Top Layer w30: C62.1@11624,13763 11624,13686 C60.1@11685,13625 11685,13580.38 11921.38,13344 LM7805.3@11978,13344 ; v1(12775,13225) 12810,13225 12870,13285 C152.1@12870,13300 12935,13365 12935,13485 12890,13530 12890,13680 v1@12890,13775 ; v1(13775,13640) 13830,13640 R85.1@13830,13700 13830,13709.01 13876.99,13756 13966,13756 13989,13733 14095,13733 14188,13640 14315,13640 U12.8@14350,13675 14370,13675 14400,13645 14560.99,13645 14595.99,13680 R91.2@14605,13680 ; C20.2@13790,11965 13815,11940 v1(13815,11915) 13815,11853 13795,11833 v1(13795,11810) 13815,11810 13854,11849 14153.01,11849 14220,11915.99 R21.1@14220,11925 14260,11925 14330,11995 R24.1@14330,12030 ; R91.2@14605,13675 14645,13675 14665,13655 14665,13540 14595,13470 14595,13250 R17.2@14645,13200 14645,13190 14750,13085 J11.2@14750,13040
  Bottom Layer w16: J1.2@13400,11700 J1.2@13400,11705 ; J1.2@13420,11705 13442,11727 13442,11737.31 13514.85,11810.15 13515,11810 13690,11810 13795,11915 v1(13815,11915)
  Bottom Layer w20: v1(12380,14255) 12380,14645 12505,14770 v1(12540,14770)
  Bottom Layer w30: LM7805.3@11978,13344 12033,13344 12134,13243 12134,13185 12184,13135 12685,13135 v1@12770,13220 ; v1@12888,13774 13337,13774 13377,13814 13461,13814 13635,13640 v1(13775,13640) ; v1(14290,11990) 14263,12017 14263,12141 14382,12260 14382,12672 14510,12800 14510,13025 14584,13099 14692.01,13099 14718.01,13073.01
+12V: C61.1 C140.2 C141.2 C200.1 C201.2 LM7805.1 LM7809.1 R143.2 U11.2 U14.5 U14.6 U14.7 U14.8 | length 5698.3
  Top Layer w20: C201.2@12765,15310 12765,15235 12850,15150 C200.1@12910,15150 C200.1@12890,15130 ; C200.1@12910,15130 C200.1@12925,15130
  Top Layer w40: C140.2@11353,14627 11242,14627 U14.8@11237,14622 U14.7@11237,14572 U14.6@11237,14522 U14.5@11237,14472 v1(11327,14472) R143.2@11395,14472 ; U11.2@12015,15150 11915,15050 11915,14774 12185,14504 v1(12185,14367) 12120,14302 C141.2@12120,13925 12120,13757 12030,13667 C61.1@12030,13610
  Bottom Layer w30: v1(11327,14472) 11842,14472 11966,14348 12166,14348 v1(12185,14367) ; 11886,13144 LM7805.1@11978,13144 ; U11.2@12015,15150 12027.5,15162.5 12112.5,15162.5 12270,15320 12740,15320 C200.1@12910,15150
  Bottom Layer w40: LM7809.1@11983,12608 11919,12608 11886,12641 11886,13144 11886,13266 11863,13289 11863,13465 12008,13610 C61.1@12030,13610
ADCMET1: "U4 TL082.5" C56.2 R73.1 TP2.1 | length 1077.4
  Top Layer w20: v1(13260,14050) 13275,14050 13300,14075 C56.2@13300,14130 ; C56.2@13295,14125 C56.2@13300,14130 ; R73.1@13300,14250 R73.1@13300,14240 ; 13695,14125 13775,14125 13825,14075 TP2.1@13825,14050 ; R73.1@13295.31,14244.69 R73.1@13295,14250 13290,14250 13292.5,14247.5 R73.1@13295.31,14244.69 ; R73.1@13295.31,14244.69 13300,14165 ; R73.1@13295.31,14244.69 R73.1@13300,14240 ; C56.2@13300,14130 13300,14165 ; 13300,14165 R73.1@13300,14240
  Bottom Layer w20: v1(13260,14050) TP2.1@13825,14050
ADCMETAL: MC68HC908AP32.23 R80.2 R81.1 Socket.23 TP10.1 | length 1366.1
  Top Layer w12: MC68HC908AP32.23@13822,12941 13822,13058 13894,13130 13903,13130 13915,13142 Socket.23@13915,13155
  Top Layer w20: TP10.1@13425,13750 13430,13745 R81.1@13430,13850 R80.2@13430,13975
  Bottom Layer w16: TP10.1@13425,13750 13473,13750 13618,13605 13695,13605 13707.37,13592.63 13707.37,13432.37 13915,13224.75 Socket.23@13915,13155
ADCMETALHV: "U4 TL082.6" "U4 TL082.7" C35.1 R80.1 | length 1032.3
  Top Layer w20: C35.1@13200,13850 13200,13920 13240,13960 13310,13960 13400,14050 13585,14050 ; R80.1@13520,13975 13525,13980 13550,13980 13585,14015 13585,14050 ; 13695,14225 13755,14225 13775,14205 13775,14190 13760,14175 13695,14175 13615,14175 13585,14145 13585,14050
AJUSTE: "U6 TL082.7" R88.1 R90.2@13590,13620 TP6.1 | length 1489.2
  Top Layer w20: 13430,13570 13538.06,13570 13668.06,13700 TP6.1@13675,13700 ; R88.1@13515,14625 R88.1@13520,14625 13565,14625 13595,14595 v1(13595,14525)
  Bottom Layer w20: v1(13595,14525) 13595,14420 13880,14135 13880,13905 TP6.1@13675,13700
AJUSTE5V: "U6 TL082.5" DS1669.6@14460,13495 U12.6 | length 1616.9
  Top Layer w20: 13475,13470 13490,13485 13711.92,13485 13783.92,13413 13917,13413 14076,13254 14524,13254 14555,13285 14555,13481 14541,13495 DS1669.6@14460,13495 ; U12.6@14345,13470 U12.6@14350,13475 ; U12.6@14350,13465 U12.6@14350,13475 ; DS1669.6@14450,13495 14370,13495 U12.6@14350,13475
AJUSTEINTER: C207.1 DS1669.1@12425,14760 | length 510.7
  Top Layer w20: C207.1@12290,14355 12286,14359 12286,14700.25 12345.75,14760 DS1669.1@12425,14760
AJUSTENEG: DS1669.4@12425,14610 R201.2 | length 206.6
  Top Layer w20: DS1669.4@12425,14610 12425,14505 12465,14465 R201.2@12465,14420
AMP1: "U3 HCF4066.2" R65.2 TP4.1 | length 613.6
  Top Layer w20: 14200,14375 14145,14375 14130,14390 14130,14485 14245,14600 TP4.1@14300,14600
  Top Layer w30: TP4.1@14300,14600 14415,14715 14415,14770 R65.2@14420,14775
AONIVE: "U4 TL082.2" R70.1 R71.2 | length 658.8
  Top Layer w20: R70.1@13295,14375 13330,14375 13351,14354 13351,14280.92 13406.92,14225 13475,14225 13545,14225 13565,14245 13565,14335 13675,14445 R71.2@13705,14445
AOOUT: "U4 TL082.1" R70.2 R72.2 R73.2 | length 591.1
  Top Layer w20: R73.2@13205,14250 R70.2@13205,14375 13205,14435 ; R72.2@13205,14500 13205,14435 ; 13430,14275 13405,14275 13385,14295 13385,14380 13333,14432 13208,14432 13205,14435
AUDIO_IN: "U15 HEF4046.9" C151.1 R14.1 R15.1 | length 1232.3
  Top Layer w16: C151.1@12300,13224 12300,13141 12395,13046 12395,13035 R15.1@12395,13030
  Top Layer w20: C151.1@12300,13224 C151.1@12300,13225 ; R15.1@12395,13025 R15.1@12395,13030 ; R15.1@12395,13035 12510,13150 R14.1@12555,13150 ; 12796.85,13428.11 12799.96,13425 v1(12880,13425)
  Bottom Layer w20: C151.1@12300,13225 12300,13290 12365,13355 12810,13355 v1(12880,13425)
AUDIO_OUT: C207.2 R150.1 R151.1 | length 826.7
  Top Layer w20: C207.2@12290,14265 12290,14213.08 12222,14145.08 12222,13958 12305,13875 R150.1@12305,13675 12315,13665 R151.1@12315,13505
AUDIOATENU: DS1669.6@12645,14660 R153.1 TP1.1 U11.7 | length 1137.3
  Top Layer w20: U11.7@12315,15150 12368.48,15150 12384.24,15134.24 12470.76,15134.24 12699,14906 12826,14906 12850,14882 R153.1@12850,14830 TP1.1@12950,14730 12950,14675 12933,14658 12717,14658 12715,14660
BACKA: J1.15 R24.2 | length 571.3
  Top Layer w20: J1.15@14100,11600 14115,11600 J1.15@14120,11605 14180,11665 14180,11755 14420,11995 R24.2@14420,12030
BACKBA: Q20.1 R23.1 | length 653.9
  Top Layer w16: Q20.1@14355,12125 14355,12360 14538,12543 14538,12636 14492,12682 14490,12682
BACKC: J1.16 Q20.2 | length 825.8
  Top Layer w20: Q20.2@14395,12212 14493,12212 14520,12185 v1(14520,12110)
  Bottom Layer w16: J1.16@14120,11705 14120,11785 14270,11935 14345,11935 v1(14520,12110)
BACKLIGHT: MC68HC908AP32.18 R23.2 Socket.18 | length 612.5
  Top Layer w12: MC68HC908AP32.18@13910,12728 14081,12728 14108,12755 Socket.18@14115,12755 14139,12755 14160,12734 14160,12668 14181,12647 14381,12647 14400,12666 14400,12686
BOTON1: JButt.9 MC68HC908AP32.42 Socket.42 | length 1824.6
  Top Layer w12: JButt.9@12116,11635 12120,11635 12166,11681 12166,11755 12240,11829 12508,11829 12606,11927 12606,12059.64 12632.36,12086 12719.4,12086 13116.4,12483 13117,12483 13189,12555 Socket.42@13215,12555 13225,12565 13233,12565 13270,12602 MC68HC908AP32.42@13419,12602
BOTON2: JButt.8 MC68HC908AP32.41 Socket.41 | length 1892.8
  Top Layer w12: JButt.8@12016,11735 12016,11800 12071,11855 12497,11855 12580,11938 12580,12074.23 12617.77,12112 12708.63,12112 13105.63,12509 13105.77,12509 13201.77,12605 Socket.41@13215,12605 13221.57,12605 13249.57,12633 MC68HC908AP32.41@13419,12633
BOTON3: JButt.7 MC68HC908AP32.40 Socket.40 | length 2076.4
  Top Layer w12: JButt.7@12016,11635 11966,11685 11966,11791 12056,11881 12488,11881 12554,11947 12554,12085 12604,12135 12694.86,12135 13094.86,12535 13095,12535 13175,12615 13175,12621.57 13208.43,12655 Socket.40@13215,12655 13234.8,12655 13244.8,12665 MC68HC908AP32.40@13419,12665
BOTON4: JButt.6 MC68HC908AP32.37 Socket.37 | length 2145.6
  Top Layer w12: JButt.6@11916,11735 11916,11786 12037,11907 12481,11907 12528,11954 12528,12098 12589,12159 12675.37,12159 13175,12658.63 13175,12771.57 13208.43,12805 Socket.37@13215,12805 13220,12800 13266.89,12800 13307.89,12759 MC68HC908AP32.37@13419,12759
BOTON5: JButt.5 MC68HC908AP32.36 Socket.36 | length 2272.9
  Top Layer w12: JButt.5@11916,11635 11916,11640.29 11866,11690.29 11866,11778 11867,11779 11867,11781 12019,11933 12475,11933 12502,11960 12502,12106 12583,12187 12666.6,12187 13145,12665.4 13145,12793.8 13151,12799.8 13151,12801 13205,12855 Socket.36@13215,12855 ; 13238,12855 13243,12855 13307,12791 13363,12791
BOTON6: JButt.4 MC68HC908AP32.35 Socket.35 | length 2320.2
  Top Layer w12: Socket.35@13215,12905 13225,12905 13309,12821 13310,12822 MC68HC908AP32.35@13419,12822
  Top Layer w16: JButt.4@11816,11735 11816,11779 11998,11961 12463,11961 12474,11972 12474,12120 12568,12214 12654,12214 13117,12677 13117,12822 13200,12905 Socket.35@13215,12905
BOTON7: MC68HC908AP32.34 Socket.34 | length 264.2
  Top Layer w12: Socket.34@13205,12955 Socket.34@13215,12955 13225.31,12955 13254.15,12926.15 13254.15,12911.85 13312,12854 MC68HC908AP32.34@13419,12854
BOTON8: MC68HC908AP32.33 Socket.33 | length 252.1
  Top Layer w16: Socket.33@13415,13155 13415,13131 13507,13039 MC68HC908AP32.33@13507,12941
C1NET00004: "U15 HEF4046.6" C150.1 | length 340.1
  Top Layer w20: C150.1@12320,13380 12372,13432 12453,13432 12545.96,13524.96 12600,13524.96 12599.96,13525
C1NET00010: "U15 HEF4046.7" C150.2 | length 229.4
  Top Layer w20: C150.2@12410,13380 12450,13380 12544.96,13474.96 12600,13474.96 12599.96,13475
CEL1: Balancer.7 RL2.2 | length 1299.2
  Top Layer w40: RL2.2@10608,15591 10696,15679 10696,15827 10767,15898 11673,15898 Balancer.7@11685,15910 ; Balancer.7@11686,15911 Balancer.7@11685,15910 ; Balancer.7@11687,15910 Balancer.7@11685,15910
CEL2: Balancer.8 RL2.7 | length 1713.7
  Top Layer w40: RL2.7@10308,15591 10308,15646 10539,15877 10662,15877 10735,15950 11626,15950 11668,15992 11705,15992 Balancer.8@11786.99,15910.01 ; Balancer.8@11786,15911 Balancer.8@11786.99,15910.01 ; Balancer.8@11787,15911 Balancer.8@11787,15910
CEL3: Balancer.9 RL1.2 | length 2071.2
  Top Layer w40: RL1.2@10306,14871 10368,14871 10537,15040 10616,15040 10883,15307 11371,15307 11887,15823 Balancer.9@11887,15907.35 ; Balancer.9@11887,15910 Balancer.9@11887,15907.35 ; Balancer.9@11890,15915 11890,15910.35 Balancer.9@11887,15907.35
CHARGE+: 
CHARGE-: pad.22 pad.24 Speaker.1 | length 2737
  Top Layer w30: pad.22@14900,12100 pad.24@14800,12100 14800,12116 14785,12131 14785,12197 14855,12267 14896.54,12267 14927,12297.46 14927,12298 14936,12307 14936,13239.45 14865,13310.45 14865,14565 Speaker.1@14900,14600
CONTLCD: J1.3@13520,11605 R21.2 R22.1 | length 1023.3
  Top Layer w12: v1(13890,11905) 13903,11905 13927,11881 14098,11881 14124.5,11907.5 14124.5,11919.5 R21.2@14130,11925
  Top Layer w16: R21.2@14130,11925 14130,11960 14180,12010 R22.1@14180,12045
  Bottom Layer w12: J1.3@13520,11605 13470,11655 13470,11725.71 13528.29,11784 13704,11784 13790,11870 13855,11870 13870,11885